# Altium PCB PSOC_LAY.PcbDoc (part 3 of 3)
Units mm, origin at the board's own origin, x right, y up, seen from the top; angles counter-clockwise.
Board outline 239.8 x 205.26 mm, 2 copper layers (Top Layer, Bottom Layer); 186 components, 165 nets, 780 pads, 226 vias.
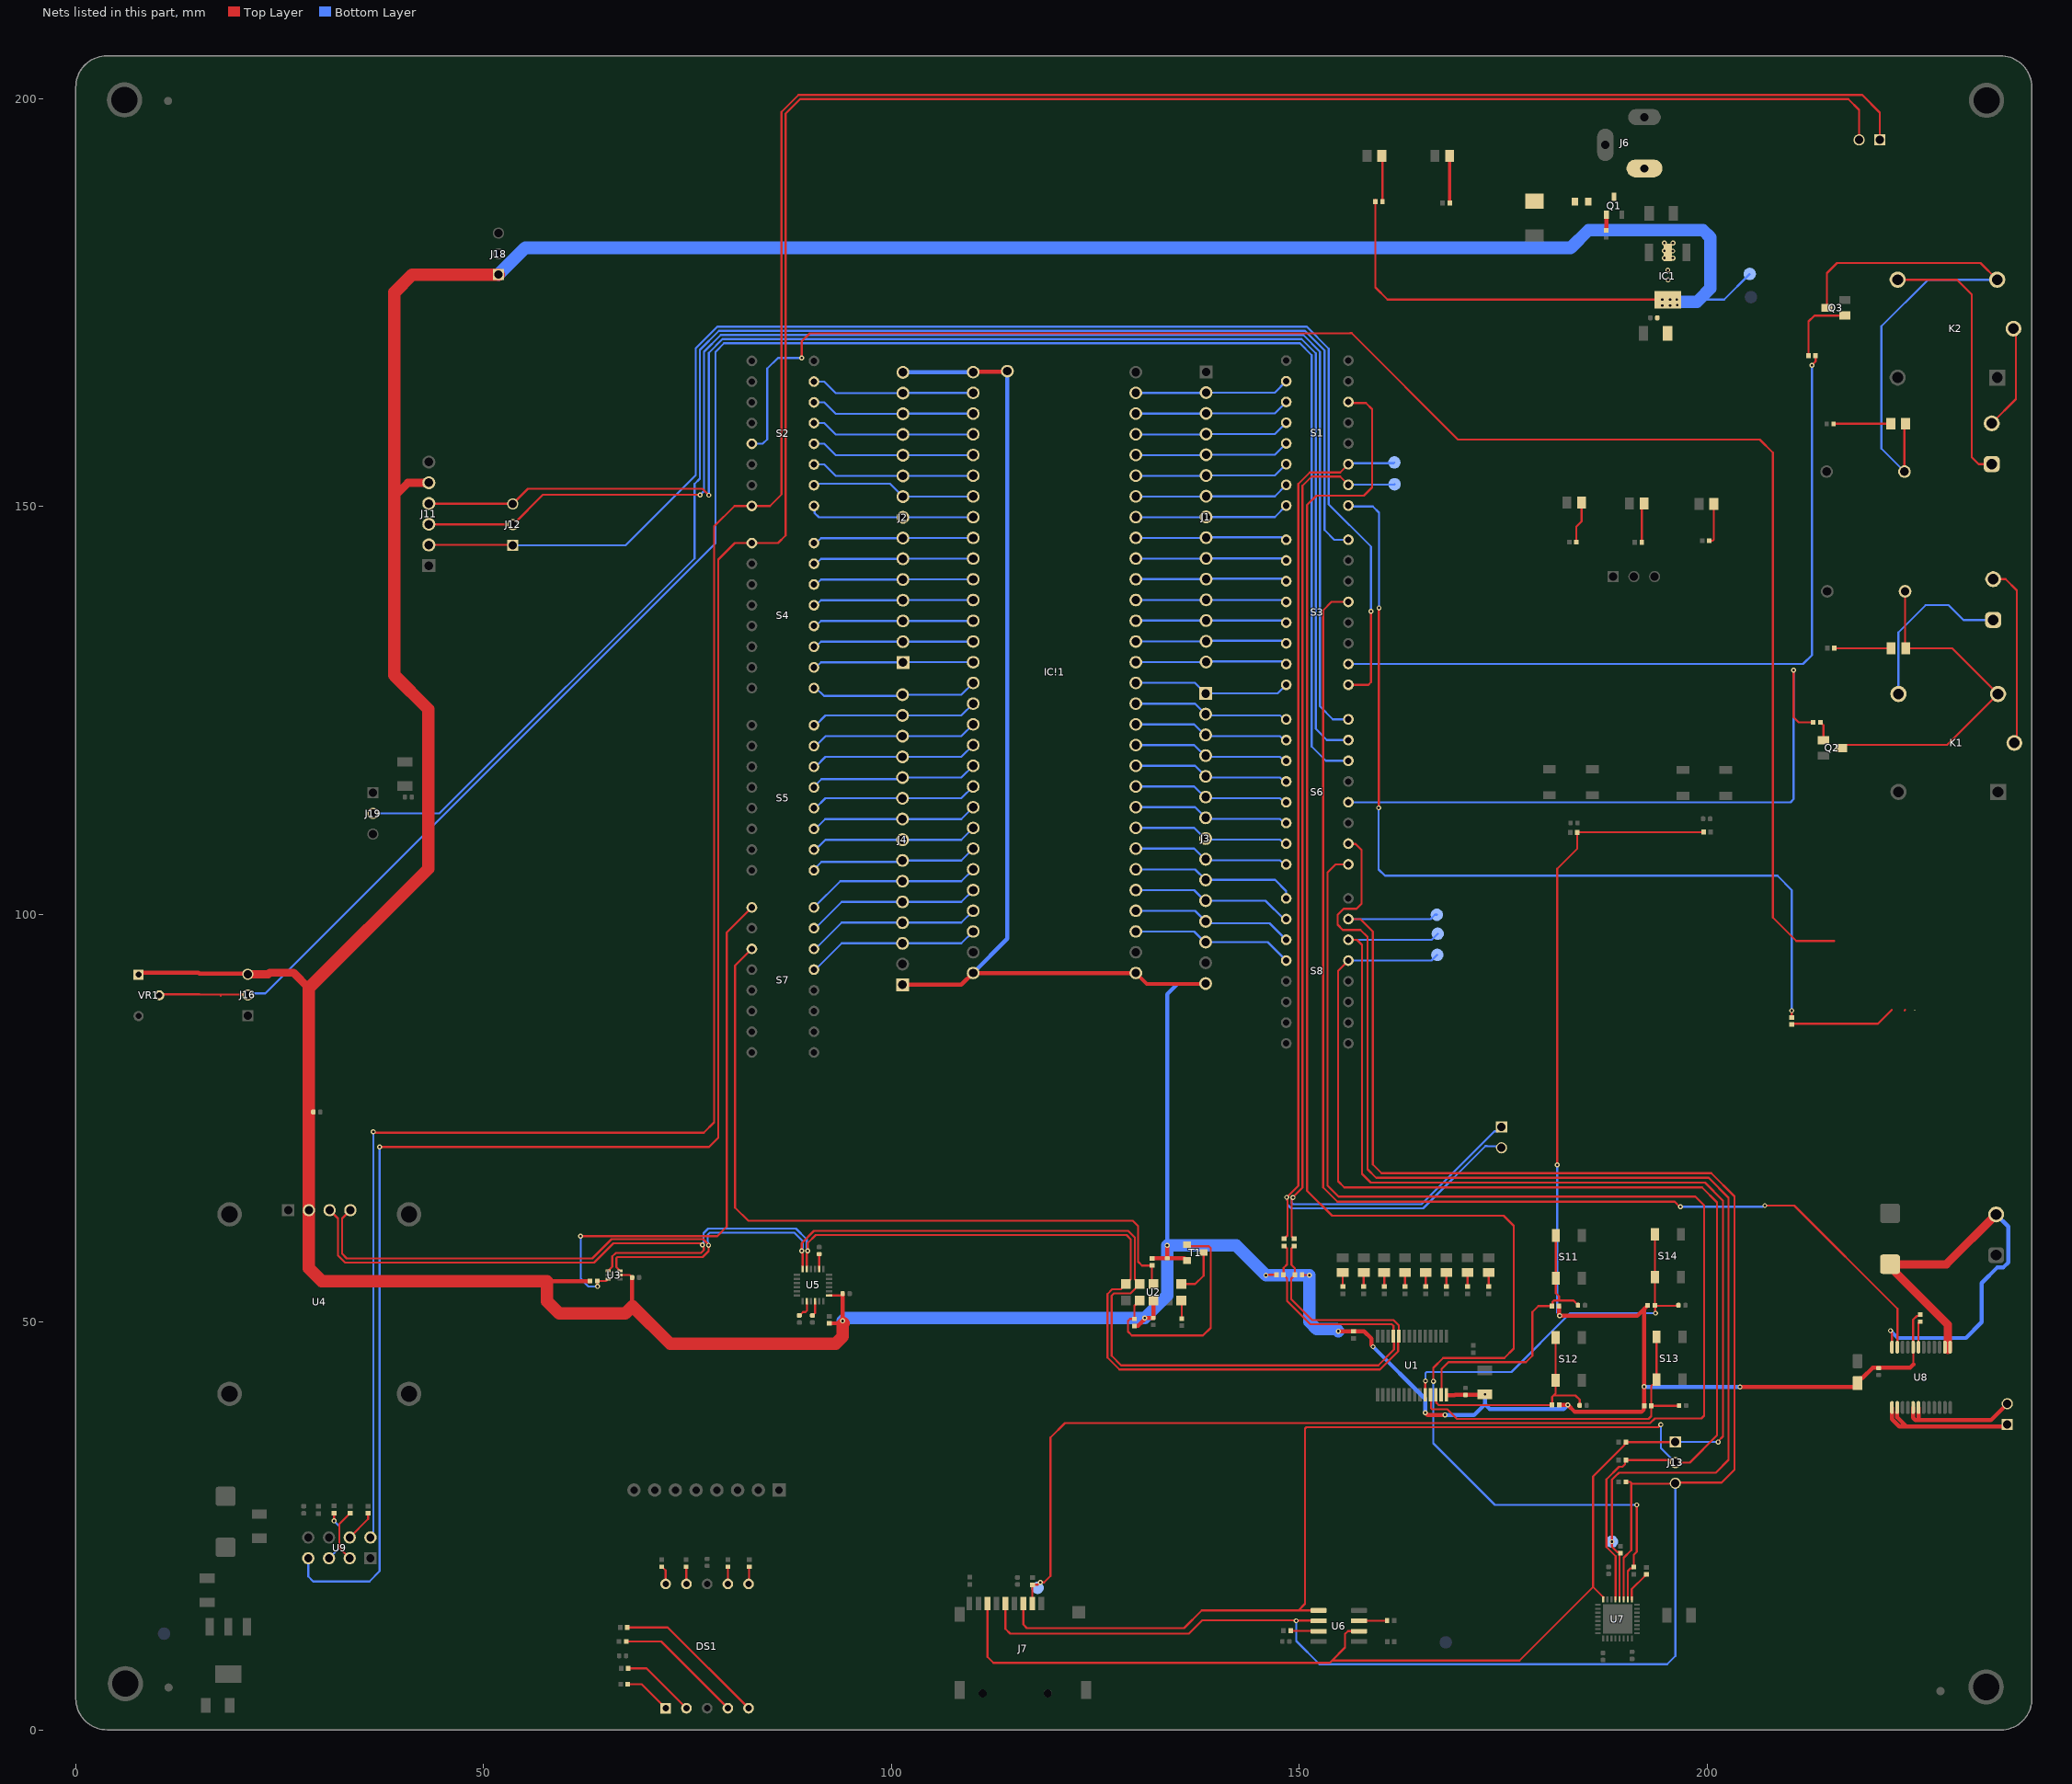
[diagram p2: the nets of this part, all layers, seen from the top]

## Via types
v1: diameter 0.61, hole 0.305, Top Layer to Bottom Layer, tented both sides, 162 vias
v2: diameter 0.61, hole 0.305, Top Layer to Bottom Layer, 64 vias

## Nets (pads, with @x,y where several pads share a name; then routed paths per layer and width w, separated by ;. In a path a pad name is that pad's centre, name@x,y a point inside that pad or via, vN(x,y) a via of type N, cw(c..) or ccw(c..) an arc to the next point about the centre after c; other vN are vias at no path point) (continued)
MISO: *5.TP J7.7 J13.1 R26.1 S8.6 U6.2 U7.24 | length 240
  Top Layer w0.254: J7.7@111.751,15.47 111.751,8.949 112.497,8.204 153.721,8.204 154,8.484 ; S8.6@156.007,96.85 157.048,96.85 157.669,96.23 157.669,68.148 158.736,67.081 199.72,67.081 201.93,64.872 201.93,35.961 201.346,35.377 v1(201.346,35.281) ; U6.2@157.313,12.09 155.947,12.09 155.6,11.743 155.6,10.084 154,8.484 ; U7.24@187.243,16.154 187.243,16.254 186.004,17.493 ; J13.1@196.088,35.306 196.037,35.255 190.041,35.255 189.868,35.082 189.868,34.931 186.004,31.067 186.004,17.493 ; 154,8.484 176.994,8.484 186.004,17.493
  Bottom Layer w0.254: S8.6@156.007,96.85 166.218,96.85 *5.TP@166.954,97.587 ; J13.1@196.088,35.306 196.113,35.281 v1(201.346,35.281)
MOSI: *7.TP J7.3 J13.2 R27.1 S8.5 U6.5 U7.21 | length 257.6
  Top Layer w0.254: J7.3@116.151,15.47 116.151,12.901 116.581,12.471 135.865,12.471 138.024,14.63 149.885,14.63 ; 150.17,14.63 149.885,14.63 ; 150.292,14.63 U6.5@152.363,14.63 ; S8.5@156.007,94.31 154.737,93.04 154.737,67.261 155.514,66.484 199.367,66.484 201.193,64.657 201.193,36.098 197.861,32.766 J13.2@196.088,32.766 ; U7.21@188.751,15.989 188.751,21.276 187.63,22.398 187.63,30.695 189.193,32.258 189.611,32.258 189.912,32.559 189.912,32.987 189.988,33.062 R27.1@190.021,33.062 195.49,33.062 J13.2@195.786,32.766 ; v1(194.31,37.414) 193.98,37.084 150.847,37.084 150.698,36.935 150.698,15.443 149.885,14.63
  Bottom Layer w0.254: S8.5@156.007,94.31 166.183,94.31 166.869,94.996 *7.TP@166.903,94.996 ; v1(194.31,37.414) 194.31,34.544 J13.2@196.088,32.766
NetC16_1: C16.1 U5.10 | length 1.9
  Top Layer w0.254: C16.1@90.297,50.798 90.318,50.798 90.627,51.107 U5.10@90.627,52.553
NetC19_1: C19.1 U5.8 | length 2.3
  Top Layer w0.254: C19.1@88.702,50.798 88.741,50.798 89.156,51.214 89.448,51.214 89.627,51.394 U5.8@89.627,52.553
NetC20_1: C20.1 U5.20 | length 1.8
  Top Layer w0.254: U5.20@91.127,56.493 91.127,58.312 C20.1@91.135,58.32
NetCR1_1: CR1.1 F1.2 J6.1 | length 0.6
  Top Layer w1.016: CR1.1@178.715,187.522 CR1.1@178.816,187.421 178.968,187.421 CR1.1@179.205,187.658
NetCS1_1: CS1.1 R53.1 | length 13.1
  Top Layer w0.254: R53.1@210.363,86.458 210.464,86.56 220.926,86.56 222.606,88.24 ; 224.206,88.189 224.257,88.24
NetD1_A: D1.A R58.2 | length 1.7
  Top Layer w0.254: R58.2@170.612,54.334 D1.A@170.612,56.072
NetD2_A: D2.A R61.2 | length 1.8
  Top Layer w0.254: R61.2@173.203,54.334 D2.A@173.203,56.072 D2.A@173.203,56.098
NetD3_A: D3.A R64.2 | length 1.8
  Top Layer w0.254: R64.2@157.886,54.224 R64.2@157.886,54.334 D3.A@157.886,56.072
NetD4_A: D4.A R62.2 | length 1.7
  Top Layer w0.254: R62.2@168.021,54.334 D4.A@168.021,56.072
NetD5_A: D5.A R59.2 | length 1.7
  Top Layer w0.254: R59.2@162.941,54.334 D5.A@162.941,56.072
NetD6_A: D6.A R60.2 | length 1.8
  Top Layer w0.254: R60.2@160.401,54.308 R60.2@160.401,54.334 D6.A@160.401,56.072
NetD7_A: D7.A R65.2 | length 1.7
  Top Layer w0.254: R65.2@155.321,54.334 D7.A@155.321,56.072
NetD8_A: D8.A R63.2 | length 1.7
  Top Layer w0.254: R63.2@165.481,54.334 D8.A@165.481,56.072
NetD9_2: D9.2 D14.C K1.A2 Q2.C | length 42.6
  Top Layer w0.254: Q2.C@216.441,120.371 216.814,120.744 229.402,120.744 K1.A2@235.644,126.986 230.042,132.588 D14.C@224.344,132.588 224.251,132.68 D9.2@224.251,139.573
NetD10_2: D10.2 D15.C K2.A2 Q3.C | length 68
  Top Layer w0.254: Q3.C@214.665,174.335 214.665,178.597 215.9,179.832 233.486,179.832 K2.A2@235.538,177.78 ; D10.2@224.175,154.254 224.175,159.989 D15.C@224.307,160.122
  Bottom Layer w0.254: D10.2@224.175,154.254 221.361,157.068 221.361,172.085 227.056,177.78 K2.A2@235.538,177.78
NetD11_A: D11.A R40.2 | length 5
  Top Layer w0.254: R40.2@200.257,145.771 200.647,145.771 200.796,145.919 D11.A@200.796,150.289
NetD12_A: D12.A R41.2 | length 4.9
  Top Layer w0.254: R41.2@191.976,145.593 191.976,150.055 D12.A@192.264,150.343
NetD13_A: D13.A R42.2 | length 5.1
  Top Layer w0.254: R42.2@183.95,145.618 183.95,147.497 184.593,148.14 D13.A@184.593,150.444
NetD14_A: D14.A R22.1 | length 7
  Top Layer w0.254: R22.1@215.568,132.613 215.593,132.588 D14.A@222.544,132.588
NetD15_A: D15.A R15.1 | length 7
  Top Layer w0.254: R15.1@215.492,160.096 215.517,160.122 D15.A@222.507,160.122
NetD18_A: D18.A R17.1 | length 5.5
  Top Layer w0.381: D18.A@168.413,192.71 168.422,192.701 168.422,187.181 R17.1@168.431,187.173
NetD20_A: D20.A R68.1 | length 5.1
  Top Layer w0.254: D20.A@160.166,192.481 160.184,192.464 R68.1@160.184,187.35
NetDS1_1: DS1.1 R48.1 | length 5.9
  Top Layer w0.254: R48.1@67.658,5.588 69.367,5.588 DS1.1@72.314,2.642
NetDS1_2: DS1.2 R47.1 | length 9.2
  Top Layer w0.254: R47.1@67.72,7.524 69.972,7.524 DS1.2@74.854,2.642
NetDS1_4: DS1.4 R46.1 | length 15.9
  Top Layer w0.254: R46.1@67.469,10.82 71.755,10.82 DS1.4@79.934,2.642
NetDS1_5: DS1.5 R52.1 | length 19
  Top Layer w0.254: R52.1@67.596,12.548 72.568,12.548 DS1.5@82.474,2.642
NetDS1_6: DS1.6 R45.1 | length 2.1
  Top Layer w0.254: DS1.6@82.474,17.882 82.525,17.932 82.525,19.936 R45.1@82.575,19.987
NetDS1_7: DS1.7 R43.1 | length 2.1
  Top Layer w0.254: DS1.7@79.934,17.882 R43.1@79.934,19.987
NetDS1_9: DS1.9 R49.1 | length 2.1
  Top Layer w0.254: R49.1@74.803,19.987 74.828,19.961 74.828,17.907 DS1.9@74.854,17.882
NetDS1_10: DS1.10 R50.1 | length 2.3
  Top Layer w0.254: R50.1@71.831,19.987 71.851,19.987 72.314,19.524 DS1.10@72.314,17.882
NetF1_1: F1.1 Q1.3
NetJ8_1: J8.1 U8.1 U8.2 | length 18.3
  Top Layer w0.508: U8.1@222.637,39.505 222.637,38.094 223.545,37.186 224.409,37.186 ; U8.2@223.287,38.959 223.287,38.307 224.409,37.186 ; J8.1@236.779,37.44 236.525,37.186 224.409,37.186
NetJ8_2: J8.2 U8.5 U8.6 | length 15.3
  Top Layer w0.508: U8.5@225.237,39.505 225.237,38.245 225.535,37.948 225.84,37.948 ; U8.6@225.887,39.505 225.887,37.995 225.84,37.948 ; J8.2@236.779,39.98 234.747,37.948 225.84,37.948
NetJ9_1: J9.1 K1.NO | length 21.3
  Bottom Layer w0.254: K1.NO@223.444,126.986 223.444,134.544 226.773,137.873 229.599,137.873 231.404,136.068 J9.1@235.052,136.068
NetJ9_2: J9.2 K1.COM | length 22.3
  Top Layer w0.254: J9.2@235.052,141.068 236.579,141.068 237.947,139.7 237.947,121.289 K1.COM@237.644,120.986
NetJ10_1: J10.1 K2.NO | length 32.6
  Top Layer w0.254: K2.NO@223.338,177.78 230.626,177.78 232.435,175.971 232.435,156.007 233.274,155.169 J10.1@234.874,155.169
NetJ10_2: J10.2 K2.COM | length 13
  Top Layer w0.254: J10.2@234.874,160.169 237.846,163.14 237.846,171.473 K2.COM@237.538,171.78
NetQ1_1: Q1.1 R3.1 | length 1.9
  Top Layer w0.5: R3.1@187.604,183.823 187.62,183.838 Q1.1@187.62,185.742
NetQ2_B: Q2.B R54.1 | length 2.4
  Top Layer w0.254: R54.1@213.871,123.52 213.871,123.5 214.024,123.347 214.044,123.347 214.241,123.15 Q2.B@214.241,121.321
NetQ3_B: Q3.B R55.1 | length 9
  Top Layer w0.254: R55.1@212.414,168.453 212.414,172.663 213.136,173.385 Q3.B@216.865,173.385
NetR1_1: R1.1 U8.19 | length 3.2
  Top Layer w0.254: U8.19@225.887,46.905 225.887,49.828 226.091,50.032 R1.1@226.111,50.032
NetR8_1: R8.1 T1.1 U2.2 | length 28.3
  Top Layer w0.254: U2.2@130.431,52.645 129.769,51.983 R8.1@129.769,50.371 129.224,50.371 128.981,50.129 128.981,48.808 129.453,48.336 138.176,48.336 139.119,49.279 139.119,59.055 138.896,59.278 136.403,59.278 T1.1@136.22,59.461
NetR9_1: R9.1 U2.5 | length 2.2
  Top Layer w0.254: U2.5@135.531,52.645 135.585,52.59 R9.1@135.585,50.422
NetR19_1: R19.1 U6.3 | length 3.4
  Top Layer w0.254: U6.3@157.313,13.36 160.725,13.36 R19.1@160.75,13.386
NetR21_2: R21.2 U7.17 | length 3.8
  Top Layer w0.254: U7.17@190.751,15.989 190.751,17.241 192.384,18.874 192.384,18.894 192.527,19.037 R21.2@192.547,19.037
NetR23_2: R23.2 U6.7 | length 3.5
  Top Layer w0.254: R23.2@148.923,12.141 148.949,12.116 152.338,12.116 U6.7@152.363,12.09
NetR37_2: R37.2 U9.7 | length 3.9
  Top Layer w0.254: U9.7@33.579,23.575 35.839,25.836 R37.2@35.839,26.54
NetR38_1: R38.1 U9.3 | length 6.3
  Top Layer w0.254: v1(31.648,25.603) 31.661,25.616 31.661,26.552 R38.1@31.674,26.565
  Bottom Layer w0.254: U9.3@31.039,21.035 32.309,22.305 32.309,24.943 v1(31.648,25.603)
NetR39_1: R39.1 U9.2 | length 6.6
  Top Layer w0.254: U9.2@33.579,21.035 32.309,22.305 32.309,25.239 33.61,26.54 R39.1@33.63,26.54
NetT1_3: T1.3 U2.6 | length 6
  Top Layer w0.254: U2.6@135.531,54.645 137.22,54.645 138.252,55.677 T1.3@138.252,58.496
P0_0: IC!1.46 J4.15 S4.1 | length 20.6
  Bottom Layer w0.254: S4.1@90.493,127.709 90.748,127.709 91.711,126.746 101.194,126.746 J4.15@101.346,126.898 108.56,126.898 IC!1.46@110.007,128.346
P0_1: IC!1.47 J4.14 S5.8 | length 20.6
  Bottom Layer w0.254: S5.8@90.493,123.154 90.696,123.154 91.9,124.358 J4.14@101.346,124.358 108.56,124.358 IC!1.47@110.007,125.806
P0_2: IC!1.48 J4.13 S5.7 | length 20.6
  Bottom Layer w0.254: S5.7@90.493,120.614 90.721,120.614 91.39,121.282 91.395,121.282 91.931,121.818 92.942,121.818 J4.13@101.346,121.818 108.56,121.818 IC!1.48@110.007,123.266
P0_3: IC!1.49 J4.12 S5.6 | length 20.6
  Bottom Layer w0.254: S5.6@90.493,118.074 90.696,118.074 91.9,119.278 J4.12@101.346,119.278 108.56,119.278 IC!1.49@110.007,120.726
P0_4: IC!1.50 J4.11 S5.5 | length 20.7
  Bottom Layer w0.254: S5.5@90.493,115.534 90.493,115.654 91.4,116.561 101.168,116.561 J4.11@101.346,116.738 108.56,116.738 IC!1.50@110.007,118.186
P0_5: IC!1.51 J4.10 S5.4 | length 20.6
  Bottom Layer w0.254: S5.4@90.493,112.994 90.686,112.994 91.891,114.198 92.942,114.198 J4.10@101.346,114.198 108.56,114.198 IC!1.51@110.007,115.646
P0_6: IC!1.52 J4.9 S5.3 | length 20.6
  Bottom Layer w0.254: S5.3@90.493,110.454 90.669,110.454 91.874,111.658 J4.9@101.346,111.658 108.56,111.658 IC!1.52@110.007,113.106
P0_7: IC!1.53 J4.8 S5.2 | length 20.6
  Bottom Layer w0.254: S5.2@90.493,107.914 90.696,107.914 91.9,109.118 J4.8@101.346,109.118 108.56,109.118 IC!1.53@110.007,110.566
P1_0: IC!1.28 J3.13 S8.A5 | length 19.9
  Bottom Layer w0.254: IC!1.28@129.946,97.866 137.109,97.866 138.405,96.571 J3.13@138.506,96.571 146.126,96.571 S8.A5@148.387,94.31
P1_1: IC!1.27 J3.12 S8.A6 | length 19.9
  Bottom Layer w0.254: IC!1.27@129.946,100.406 137.211,100.406 J3.12@138.506,99.111 138.735,98.882 146.355,98.882 S8.A6@148.387,96.85
P1_2: IC!1.26 J3.11 S8.A7 | length 19.9
  Bottom Layer w0.254: IC!1.26@129.946,102.946 137.109,102.946 138.405,101.651 J3.11@138.506,101.651 145.847,101.651 148.107,99.39 S8.A7@148.387,99.39
P1_3: IC!1.25 J3.10 S8.A8 | length 20.4
  Bottom Layer w0.254: IC!1.25@129.946,105.486 137.211,105.486 J3.10@138.506,104.191 147.015,104.191 148.387,102.819 S8.A8@148.387,101.93
P1_4: IC!1.24 J3.9 S6.A1 | length 19.2
  Bottom Layer w0.254: IC!1.24@129.946,108.026 137.109,108.026 138.405,106.731 J3.9@138.506,106.731 138.646,106.591 147.606,106.591 148.102,106.096 S6.A1@148.387,106.096
P1_5: IC!1.23 J3.8 S6.A2 | length 19.2
  Bottom Layer w0.254: IC!1.23@129.946,110.566 137.109,110.566 138.405,109.271 J3.8@138.506,109.271 138.646,109.131 147.606,109.131 148.102,108.636 S6.A2@148.387,108.636
P1_6: IC!1.22 J3.7 S6.A3 | length 19.2
  Bottom Layer w0.254: IC!1.22@129.946,113.106 137.211,113.106 J3.7@138.506,111.811 138.646,111.671 147.606,111.671 148.102,111.176 S6.A3@148.387,111.176
P1_7: IC!1.21 J3.6 S6.A4 | length 19.2
  Bottom Layer w0.254: IC!1.21@129.946,115.646 137.109,115.646 138.405,114.351 J3.6@138.506,114.351 138.646,114.211 147.606,114.211 148.102,113.716 S6.A4@148.387,113.716
P2_0: IC!1.20 J3.5 S6.A5 | length 19.2
  Bottom Layer w0.254: IC!1.20@129.946,118.186 137.211,118.186 J3.5@138.506,116.891 138.646,116.751 147.606,116.751 148.102,116.256 S6.A5@148.387,116.256
P2_1: IC!1.19 J3.4 S6.A6 | length 19.2
  Bottom Layer w0.254: IC!1.19@129.946,120.726 137.109,120.726 138.405,119.431 J3.4@138.506,119.431 138.646,119.291 147.606,119.291 148.102,118.796 S6.A6@148.387,118.796
P2_2: IC!1.18 J3.3 S6.A7 | length 19.2
  Bottom Layer w0.254: IC!1.18@129.946,123.266 137.109,123.266 138.405,121.971 J3.3@138.506,121.971 138.646,121.831 147.606,121.831 148.102,121.336 S6.A7@148.387,121.336
P2_3: IC!1.17 J3.2 S6.A8 | length 19.2
  Bottom Layer w0.254: IC!1.17@129.946,125.806 137.211,125.806 J3.2@138.506,124.511 138.646,124.371 147.606,124.371 148.102,123.876 S6.A8@148.387,123.876
P2_4: IC!1.16 J3.1 S3.A1 | length 19.4
  Bottom Layer w0.254: IC!1.16@129.946,128.346 137.211,128.346 J3.1@138.506,127.051 147.32,127.051 S3.A1@148.387,128.118
P2_5: IC!1.15 J1.15 S3.A2 | length 18.6
  Bottom Layer w0.254: IC!1.15@129.946,130.886 138.532,130.886 J1.15@138.557,130.912 ; J1.15@138.557,130.975 147.225,130.975 147.227,130.972 147.787,130.972 148.102,130.658 S3.A2@148.387,130.658
P2_6: IC!1.14 J1.14 S3.A3 | length 18.6
  Bottom Layer w0.254: IC!1.14@129.946,133.426 138.532,133.426 J1.14@138.557,133.452 ; J1.14@138.557,133.515 147.784,133.515 148.102,133.198 S3.A3@148.387,133.198
P2_7: IC!1.13 J1.13 S3.A4 | length 18.6
  Bottom Layer w0.254: IC!1.13@129.946,135.966 129.972,135.992 147.848,135.992 148.102,135.738 S3.A4@148.387,135.738
P3_0: IC!1.7 J1.7 S1.A2 | length 19
  Bottom Layer w0.254: IC!1.7@129.946,151.206 129.959,151.194 138.519,151.194 J1.7@138.557,151.232 146.99,151.232 S1.A2@148.387,152.629
P3_1: IC!1.6 J1.6 S1.A3 | length 19
  Bottom Layer w0.254: IC!1.6@129.946,153.746 129.959,153.733 138.519,153.733 J1.6@138.557,153.772 146.99,153.772 S1.A3@148.387,155.169
P3_2: IC!1.5 J1.5 S1.A4 | length 19
  Bottom Layer w0.254: IC!1.5@129.946,156.286 129.959,156.273 138.519,156.273 J1.5@138.557,156.312 146.99,156.312 S1.A4@148.387,157.709
P3_3: IC!1.4 J1.4 S1.A5 | length 19
  Bottom Layer w0.254: IC!1.4@129.946,158.826 129.959,158.814 138.519,158.814 J1.4@138.557,158.852 146.99,158.852 S1.A5@148.387,160.249
P3_4: IC!1.3 J1.3 S1.A6 | length 19
  Bottom Layer w0.254: IC!1.3@129.946,161.366 129.959,161.353 138.519,161.353 J1.3@138.557,161.392 146.99,161.392 S1.A6@148.387,162.789
P3_5: IC!1.2 J1.2 S1.A7 | length 19
  Bottom Layer w0.254: IC!1.2@129.946,163.906 129.959,163.893 138.519,163.893 J1.2@138.557,163.932 146.99,163.932 S1.A7@148.387,165.329
P3_6: IC!1.32 J2.14 S2.7 | length 20.1
  Bottom Layer w0.254: S2.7@90.493,165.284 91.763,165.284 93.166,163.881 J2.14@101.397,163.881 101.409,163.893 109.995,163.893 IC!1.32@110.007,163.906
P3_7: IC!1.33 J2.13 S2.6 | length 20.1
  Bottom Layer w0.254: S2.6@90.493,162.744 91.763,162.744 93.166,161.341 J2.13@101.397,161.341 101.409,161.353 109.995,161.353 IC!1.33@110.007,161.366
P4_0: IC!1.34 J2.12 S2.5 | length 20.1
  Bottom Layer w0.254: S2.5@90.493,160.204 91.763,160.204 93.166,158.801 J2.12@101.397,158.801 101.409,158.814 109.995,158.814 IC!1.34@110.007,158.826
P4_1: IC!1.35 J2.11 S2.4 | length 20.1
  Bottom Layer w0.254: S2.4@90.493,157.664 91.763,157.664 93.166,156.261 J2.11@101.397,156.261 101.409,156.273 109.995,156.273 IC!1.35@110.007,156.286
P4_2: IC!1.36 J2.10 S2.3 | length 20.1
  Bottom Layer w0.254: S2.3@90.493,155.124 91.763,155.124 93.166,153.721 J2.10@101.397,153.721 101.409,153.733 109.995,153.733 IC!1.36@110.007,153.746
P4_3: IC!1.37 J2.9 S2.2 | length 20.2
  Bottom Layer w0.254: S2.2@90.493,152.584 90.664,152.756 99.822,152.756 J2.9@101.397,151.181 101.409,151.194 109.995,151.194 IC!1.37@110.007,151.206
P4_4: IC!1.38 J2.8 S2.1 | length 20.6
  Bottom Layer w0.254: S2.1@90.493,150.044 90.577,149.96 90.577,149.173 91.11,148.641 J2.8@101.397,148.641 101.409,148.653 109.995,148.653 IC!1.38@110.007,148.666
P4_5: IC!1.39 J2.7 S4.8 | length 19.8
  Bottom Layer w0.254: S4.8@90.493,145.489 90.733,145.489 91.345,146.101 J2.7@101.397,146.101 101.409,146.113 109.995,146.113 IC!1.39@110.007,146.126
P4_6: IC!1.40 J2.6 S4.7 | length 19.8
  Bottom Layer w0.254: S4.7@90.493,142.949 90.733,142.949 91.345,143.561 J2.6@101.397,143.561 101.409,143.573 109.995,143.573 IC!1.40@110.007,143.586
P4_7: IC!1.41 J2.5 S4.6 | length 19.8
  Bottom Layer w0.254: S4.6@90.493,140.409 90.733,140.409 91.345,141.021 J2.5@101.397,141.021 101.409,141.034 109.995,141.034 IC!1.41@110.007,141.046
P5_0: IC!1.54 J4.7 S5.1 | length 20.7
  Bottom Layer w0.254: S5.1@90.493,105.374 90.493,105.494 91.4,106.401 101.168,106.401 J4.7@101.346,106.578 108.56,106.578 IC!1.54@110.007,108.026
P5_1: IC!1.55 J4.6 S7.8 | length 21.4
  Bottom Layer w0.254: S7.8@90.493,100.819 93.712,104.038 J4.6@101.346,104.038 108.56,104.038 IC!1.55@110.007,105.486
P5_2: IC!1.56 J4.5 S7.7 | length 21.4
  Bottom Layer w0.254: S7.7@90.493,98.279 90.669,98.279 93.889,101.498 J4.5@101.346,101.498 108.56,101.498 IC!1.56@110.007,102.946
P5_3: IC!1.57 J4.4 S7.6 | length 21.4
  Bottom Layer w0.254: S7.6@90.493,95.739 90.687,95.739 93.906,98.958 J4.4@101.346,98.958 108.56,98.958 IC!1.57@110.007,100.406
P5_5: IC!1.58 J4.3 S7.5 | length 21.4
  Bottom Layer w0.254: S7.5@90.493,93.199 90.687,93.199 93.906,96.418 J4.3@101.346,96.418 108.56,96.418 IC!1.58@110.007,97.866
P5_6: IC!1.42 J2.4 S4.5 | length 19.8
  Bottom Layer w0.254: S4.5@90.493,137.869 90.733,137.869 91.345,138.481 J2.4@101.397,138.481 101.409,138.493 109.995,138.493 IC!1.42@110.007,138.506
P5_7: IC!1.43 J2.3 S4.4 | length 19.8
  Bottom Layer w0.254: S4.4@90.493,135.329 90.733,135.329 91.345,135.941 J2.3@101.397,135.941 101.409,135.953 109.995,135.953 IC!1.43@110.007,135.966
P6_0: IC!1.12 J1.12 S3.A5 | length 18.5
  Bottom Layer w0.254: IC!1.12@129.946,138.506 147.873,138.506 148.102,138.278 S3.A5@148.387,138.278
P6_1: IC!1.11 J1.11 S3.A6 | length 18.6
  Bottom Layer w0.254: IC!1.11@129.946,141.046 129.972,141.072 J1.11@138.557,141.072 ; J1.11@138.557,141.135 147.784,141.135 148.102,140.818 S3.A6@148.387,140.818
P6_2: IC!1.10 J1.10 S3.A7 | length 18.6
  Bottom Layer w0.254: IC!1.10@129.946,143.586 138.532,143.586 J1.10@138.557,143.612 147.848,143.612 148.102,143.358 S3.A7@148.387,143.358
P6_4: IC!1.9 J1.9 S3.A8 | length 18.5
  Bottom Layer w0.254: IC!1.9@129.946,146.126 129.959,146.113 138.519,146.113 J1.9@138.557,146.152 ; J1.9@138.608,146.202 147.797,146.202 148.102,145.898 S3.A8@148.387,145.898
P6_5: IC!1.8 J1.8 S1.A1 | length 19
  Bottom Layer w0.254: IC!1.8@129.946,148.666 138.532,148.666 J1.8@138.557,148.692 146.99,148.692 S1.A1@148.387,150.089
P7_0: IC!1.44 J2.2 S4.3 | length 19.8
  Bottom Layer w0.254: S4.3@90.493,132.789 90.733,132.789 91.345,133.401 J2.2@101.397,133.401 101.409,133.413 109.995,133.413 IC!1.44@110.007,133.426
P7_1: IC!1.45 J2.1 S4.2 | length 19.8
  Bottom Layer w0.254: S4.2@90.493,130.249 90.733,130.249 91.345,130.861 J2.1@101.397,130.861 101.422,130.886 IC!1.45@110.007,130.886
PIR: R20.2 S1.6 U7.18 | length 208.3
  Top Layer w0.254: S1.6@156.032,162.789 156.152,162.669 158.151,162.669 158.928,161.892 158.928,152.324 157.912,151.308 152.095,151.308 150.952,150.165 150.952,66.073 154.008,63.017 175.031,63.017 176.276,61.773 176.276,46.729 175.136,45.589 167.636,45.589 166.421,44.374 v1(166.421,42.723) ; U7.18@190.251,15.989 190.251,19.46 190.581,19.789 190.83,19.789 R20.2@190.983,19.942 190.983,21.445 191.364,21.826 v1(191.364,27.571)
  Bottom Layer w0.254: v1(166.421,42.723) 166.421,35.128 173.978,27.571 v1(191.364,27.571)
POT: J16.2 S6.6 VR1.2 | length 242.2
  Top Layer w0.254: VR1.2@10.236,90.043 10.351,90.157 15.165,90.157 ; 15.178,90.145 21.031,90.145 J16.2@21.082,90.094 ; 17.756,90.005 17.769,89.992 ; S6.6@156.007,118.796 S6.6@156.224,118.796
  Bottom Layer w0.254: J16.2@21.082,90.094 21.26,90.272 23.223,90.272 78.41,145.459 78.41,168.91 79.477,169.977 150.06,169.977 151.507,168.529 151.507,120.552 153.25,118.81 155.993,118.81 S6.6@156.007,118.796
PRO_INT: R6.1 S7.A6 U2.8 | length 91.5
  Top Layer w0.254: S7.A6@82.873,95.739 80.823,93.689 80.823,64.026 82.441,62.408 129.565,62.408 130.216,61.757 130.216,57.4 130.697,56.918 R6.1@131.928,56.918 131.928,54.848 U2.8@132.131,54.645
PWMA: S3.5 U8.23 | length 155.7
  Top Layer w0.254: S3.5@156.007,138.278 153.939,138.278 152.908,137.247 152.908,66.497 154.661,64.745 196.002,64.745 196.612,64.135 v1(196.708,64.135) ; v1(207.061,64.262) 210.668,64.262 223.331,51.598 223.331,47.663 223.325,47.657 223.325,46.943 U8.23@223.287,46.905
  Bottom Layer w0.254: v1(196.708,64.135) 206.837,64.135 206.965,64.262 v1(207.061,64.262)
RELAY_1: R55.2 S3.2 | length 94.2
  Top Layer w0.254: v1(212.835,167.271) 212.835,167.311 213.296,167.772 213.296,168.44 R55.2@213.284,168.453
  Bottom Layer w0.254: S3.2@156.007,130.658 211.744,130.658 212.835,131.749 v1(212.835,167.271)
RELAY_2: R54.2 S6.4 | length 79
  Top Layer w0.254: v1(210.591,129.896) 210.591,124.13 211.201,123.52 R54.2@213.001,123.52
  Bottom Layer w0.254: S6.4@156.007,113.716 210.21,113.716 210.591,114.097 v1(210.591,129.896)
RX: J14.1 S2.A1 U9.8 | length 361.8
  Top Layer w0.254: v1(36.474,73.304) 36.542,73.236 36.767,73.236 36.801,73.203 76.997,73.203 78.257,74.463 78.257,147.549 80.753,150.044 S2.A1@82.873,150.044 85.096,150.044 86.51,151.458 86.51,198.354 88.588,200.431 218.999,200.431 221.158,198.272 J14.1@221.158,194.92
  Bottom Layer w0.254: U9.8@36.119,23.575 36.119,23.914 36.474,24.27 v1(36.474,73.304)
S_N: *2.TP J5.2 R12.1 R14.1 R14.2 S1.3 U1.11 U2.9 U3.6 U4.4 U5.24 | length 340.4
  Top Layer w0.254: U4.4@33.655,63.697 32.639,62.681 32.639,58.369 33.223,57.785 63.322,57.785 65.684,60.147 76.889,60.147 77.573,59.463 v1(77.573,59.411) 77.573,58.69 76.846,57.963 66.417,57.963 66.269,57.814 66.269,56.709 U3.6@66.724,56.253 ; U5.24@89.098,56.82 89.098,58.377 89.052,58.423 89.052,58.657 v1(88.984,58.725) 88.984,59.654 90.493,61.163 129.014,61.163 129.835,60.342 129.835,55.241 U2.9@130.431,54.645 129.285,53.499 127.26,53.499 126.975,53.213 126.975,45.847 128.143,44.679 159.664,44.679 161.597,46.611 161.597,48.189 U1.11@161.526,48.26 161.526,49.524 161.32,49.729 151.34,49.729 148.488,52.581 148.488,55.33 148.06,55.758 R12.1@148.06,55.778 148.06,56.623 148.488,57.052 148.488,59.029 148.34,59.178 148.286,59.178 R14.1@148.133,59.331 ; R14.2@148.133,60.201 148.153,60.201 148.543,60.592 148.543,64.939 148.506,64.977 148.506,65.21 v1(148.438,65.278) ; v1@148.488,65.278 148.488,65.311 149.86,66.682 149.86,152.728 151.285,154.153 154.991,154.153 S1.3@156.007,155.169
  Bottom Layer w0.254: v1(77.573,59.411) 77.505,59.479 77.505,59.71 77.464,59.752 77.464,60.678 77.72,60.935 88.087,60.935 89.098,59.924 89.098,59.072 89.052,59.026 89.052,58.793 v1(88.984,58.725) ; v1(148.438,65.278) 148.506,65.21 148.506,64.977 148.552,64.93 148.552,64.382 148.998,63.935 165.187,63.935 172.809,71.557 173.019,71.557 173.025,71.552 174.574,71.552 J5.2@174.777,71.349 ; S1.3@156.007,155.169 156.108,155.27 161.544,155.27 *2.TP@161.646,155.372
S_P: *1.TP J5.1 R5.1 R5.2 R11.1 S1.2 U1.10 U2.10 U3.1 U4.3 U5.23 | length 339.7
  Top Layer w0.254: U4.3@31.115,63.697 32.131,62.681 32.131,58.159 33.013,57.277 63.533,57.277 65.895,59.639 76.51,59.639 76.739,59.411 v1@76.808,59.411 ; U3.1@65.254,56.253 65.761,56.759 65.761,58.024 66.207,58.471 76.635,58.471 76.974,58.81 76.974,59.175 76.808,59.341 v1@76.808,59.411 ; v1(76.808,59.437) v1@76.808,59.411 ; U5.23@89.606,56.82 89.606,58.377 89.652,58.423 89.652,58.657 v1(89.721,58.725) 89.721,59.672 90.703,60.655 128.803,60.655 129.327,60.132 129.327,55.241 U2.10@128.731,54.645 128.258,54.172 128.258,54.156 128.109,54.007 127.05,54.007 126.467,53.423 126.467,45.637 127.933,44.171 159.875,44.171 162.105,46.4 162.105,48.189 U1.10@162.176,48.26 162.176,49.592 161.531,50.237 151.551,50.237 148.996,52.791 148.996,55.304 149.442,55.75 R11.1@149.442,55.77 ; R5.1@149.352,59.331 149.332,59.331 149.022,59.021 149.022,56.998 149.45,56.569 R11.1@149.45,55.778 R11.1@149.45,55.758 ; R5.2@149.352,60.201 149.332,60.201 149.051,60.482 149.051,64.987 149.21,65.146 v1(149.21,65.242) 149.21,65.314 150.368,66.472 150.368,152.517 151.495,153.645 154.991,153.645 S1.2@156.007,152.629
  Bottom Layer w0.254: v1(76.808,59.437) 76.808,59.534 76.956,59.681 76.956,60.888 77.51,61.443 88.298,61.443 89.606,60.134 89.606,59.072 89.652,59.026 89.652,58.793 v1(89.721,58.725) ; v1(149.21,65.242) 149.142,65.174 149.142,65.013 149.06,64.93 149.06,64.592 149.209,64.443 164.977,64.443 173.899,73.366 174.255,73.366 J5.1@174.777,73.889 ; S1.2@156.007,152.629 156.045,152.667 161.633,152.667 *1.TP@161.671,152.705
SCK: *9.TP J7.5 J13.3 R25.1 S8.7 U6.6 U7.19 | length 265.6
  Top Layer w0.254: J7.5@113.951,15.47 113.951,12.388 114.554,11.786 136.459,11.786 138.085,13.411 v1@149.606,13.411 ; v1(149.606,13.36) 149.631,13.386 152.338,13.386 U6.6@152.363,13.36 ; S8.7@156.007,99.39 157.48,99.39 159.004,97.866 159.004,69.317 160.071,68.25 200.482,68.25 203.327,65.405 203.327,31.877 201.752,30.302 J13.3@196.088,30.302 ; U7.19@189.751,15.989 189.751,21.093 190.678,22.019 190.678,30.251 ; R25.1@190.021,30.378 190.551,30.378 190.678,30.251 ; J13.3@196.088,30.226 196.037,30.175 190.754,30.175 190.678,30.251
  Bottom Layer w0.254: v1(149.606,13.36) 149.606,10.892 152.472,8.026 195.072,8.026 196.088,9.042 J13.3@196.088,30.226 ; S8.7@156.007,99.39 166.069,99.39 166.602,99.924 *9.TP@166.853,99.924
SD_CARD_CS: *3.TP J7.2 R34.2 S6.1 | length 217.5
  Top Layer w0.254: J7.2@117.251,15.47 117.251,17.745 R34.2@117.283,17.777 117.924,17.777 118.206,18.059 v1(118.237,18.059) 118.248,18.071 118.688,18.071 119.482,18.865 119.482,35.814 121.26,37.592 192.996,37.592 193.581,38.176 199.288,38.176 199.619,38.506 199.619,64.287 198.552,65.354 154.813,65.354 153.441,66.726 153.441,105.105 154.432,106.096 S6.1@156.007,106.096
SECURE_CS: *4.TP R16.2 S6.2 U7.20 | length 154.4
  Top Layer w0.254: S6.2@156.007,108.636 156.055,108.588 156.893,108.588 157.607,107.874 157.607,101.27 156.997,100.66 155.423,100.66 154.686,99.924 154.686,98.698 155.315,98.069 157.48,98.069 158.344,97.206 158.344,68.732 159.41,67.666 200.177,67.666 202.616,65.227 202.616,33.096 201.041,31.521 189.175,31.521 188.713,31.059 188.316,30.662 v1(188.316,23.063) 188.316,22.43 188.955,21.791 189.204,21.791 R16.2@189.357,21.638 189.253,21.534 189.253,15.991 U7.20@189.251,15.989
SERVO_SIG: J19.2 S3.8 | length 182.2
  Bottom Layer w0.254: J19.2@36.424,112.344 44.577,112.344 75.844,143.612 75.844,152.735 76.505,153.395 76.505,169.16 78.845,171.501 150.691,171.501 153.086,169.106 153.086,147.091 154.28,145.898 S3.8@156.007,145.898
SHIELD: S2.A4 | length 208.8
  Top Layer w0.254: v1(89.002,168.199) 89.002,170.231 89.967,171.196 156.185,171.196 156.206,171.218 156.417,171.218 169.443,158.191 206.426,158.191 208.051,156.566 208.051,99.568 210.922,96.698 215.57,96.698
  Bottom Layer w0.254: S2.A4@82.873,157.664 84.207,157.664 84.76,158.217 84.76,166.878 86.081,168.199 v1(89.002,168.199)
SW_joy: J11.2 J12.1 S3.1 | length 177.8
  Top Layer w0.254: J11.2@43.282,145.263 53.518,145.263 J12.1@53.569,145.212 ; S3.1@156.007,128.118 158.456,128.118 158.775,128.437 v1(158.775,137.131)
  Bottom Layer w0.254: J12.1@53.569,145.212 67.412,145.212 75.997,153.797 75.997,169.371 78.635,172.009 150.901,172.009 153.594,169.316 153.594,150.241 158.775,145.059 v1(158.775,137.131) v1@158.627,136.982
switch1: C33.1 R56.1 S11.1 S11.2 U1.27 | length 35.2
  Top Layer w0.254: U1.27@167.376,41.059 167.429,41.112 167.429,44.239 168.271,45.081 177.785,45.081 178.562,45.858 178.562,51.206 179.299,51.943 R56.1@180.95,51.943 181.028,52.022 181.028,52.475 181.177,52.624 181.82,52.624 ; S11.2@181.432,60.597 S11.1@181.432,55.347 181.432,53.525 181.82,53.137 181.82,52.624 ; C33.1@184.152,52.045 184.152,52.075 183.602,52.624 181.82,52.624
switch2: C36.1 R57.1 S12.1 S12.2 U1.26 | length 27.8
  Top Layer w0.254: U1.26@166.726,41.059 166.779,41.006 166.779,40.095 167.002,39.872 167.011,39.872 167.076,39.807 180.949,39.807 R57.1@180.984,39.843 180.984,40.816 181.407,41.239 S12.1@181.407,42.841 S12.2@181.407,48.091 ; 181.193,40.996 183.845,40.996 184.355,40.486 C36.1@184.355,39.772
switch3: C34.1 R66.1 S13.1 S13.2 U1.25 | length 42.8
  Top Layer w0.254: U1.25@166.076,41.059 166.129,41.006 166.129,39.443 166.277,39.294 168.127,39.294 169.321,38.1 192.786,38.1 193.134,38.448 R66.1@193.134,39.7 ; S13.2@193.777,48.176 S13.1@193.777,42.926 193.777,42.651 193.404,42.278 193.282,42.278 193.134,42.129 R66.1@193.134,39.7 ; C34.1@196.547,39.751 196.522,39.726 193.159,39.726 R66.1@193.134,39.7
switch4: C35.1 R67.1 S14.1 S14.2 U1.24 | length 46.5
  Top Layer w0.254: U1.24@165.426,41.059 165.441,41.074 165.441,42.759 v1(165.456,42.774) ; S14.2@193.574,60.74 S14.1@193.574,55.49 R67.1@193.574,52.028 R67.1@193.612,51.99 ; v1(193.65,51.079) 193.612,51.117 R67.1@193.612,51.99 ; C35.1@196.467,52.045 196.404,51.981 193.621,51.981 R67.1@193.612,51.99
  Bottom Layer w0.254: v1(165.456,42.774) 165.456,43.722 165.604,43.87 175.986,43.87 183.195,51.079 v1(193.65,51.079)
TEMP_ALERT: R13.1 S7.A8 U3.3 | length 68.4
  Top Layer w0.254: v1(61.874,60.528) 78.638,60.528 79.807,61.697 79.807,97.753 S7.A8@82.873,100.819 ; v1(63.957,54.356) 63.933,54.38 63.933,54.993 R13.1@63.91,55.016 64.973,55.016 U3.3@65.075,55.118
  Bottom Layer w0.254: v1@61.9,60.528 61.9,55.296 62.84,54.356 v1(63.957,54.356)
TOUCH_1: R53.2 S1.1 | length 115.2
  Top Layer w0.254: v1(159.715,113.03) 159.741,113.055 159.741,137.516 v1(159.766,137.541) ; v1(210.363,88.163) 210.363,87.348 R53.2@210.383,87.328
  Bottom Layer w0.254: S1.1@156.007,150.089 156.113,149.982 158.989,149.982 159.766,149.205 v1(159.766,137.541) ; v1(159.715,113.03) 159.715,105.486 160.499,104.703 208.606,104.703 210.363,102.946 v1(210.363,88.163)
TX: J14.2 S4.A8 U9.4 | length 374.4
  Top Layer w0.254: v1(37.236,71.45) 77.632,71.45 78.765,72.584 78.765,143.459 80.795,145.489 S4.A8@82.873,145.489 86.079,145.489 87.018,146.429 87.018,198.143 88.798,199.923 217.297,199.923 218.618,198.603 J14.2@218.618,194.92
  Bottom Layer w0.254: U9.4@28.499,21.035 28.499,18.796 29.108,18.186 35.992,18.186 37.254,19.448 37.254,71.433 v1(37.236,71.45)
VCC: *10.TP C1.2 C5.1 C7.1 C9.2 C10.2 C11.1 C12.2 C13.2 C15.2 C21.1 C22.1 IC1.2 IC1.4 IC!1.30 IC!1.31 IC!1.60 IC!1.61 J2.15 J3.15 J4.1 J11.5 J16.3 J18.1 R1.2 R2.2 R6.2 R8.2 R10.1 R11.2 R12.2 R13.2 R44.2 R51.1 R56.2 R57.2 R66.2 R67.2 R68.2 T1.2 U1.28 U2.3 U3.5 U4.2 U5.13 U8.20 VR1.1 | length 921.8
  Top Layer w0.254: U3.5@66.724,55.753 67.917,55.753 68.201,55.469 C13.2@68.201,55.448 ; U5.13@92.347,53.273 92.602,53.273 92.636,53.238 93.779,53.238 93.844,53.304 93.865,53.304 C12.2@94.007,53.446 ; v1(145.898,55.728) 145.948,55.778 R12.2@147.19,55.778 ; R11.2@150.32,55.778 150.346,55.753 151.181,55.753 v1(151.206,55.728) ; R68.2@159.314,187.578 R68.2@159.314,187.35 159.314,176.83 160.812,175.332 v2(194.492,175.332) ; v1(181.61,69.266) 181.596,69.279 181.596,105.57 184.072,108.046 R44.2@184.072,110.007 184.098,110.033 199.513,110.033 R51.1@199.539,110.059 ; 225.273,44.806 225.273,46.87 U8.20@225.237,46.905 225.237,50.277 225.709,50.749 225.958,50.749 R1.2@226.111,50.902
  Top Layer w0.5: C13.2@68.201,55.448 68.201,51.97 68.25,51.921 ; R2.2@92.354,49.835 93.714,49.835 v1(94.007,50.128) 94.007,53.446 C12.2@94.007,53.467 ; J4.1@101.346,91.338 108.56,91.338 IC!1.60@110.007,92.786 IC!1.30@129.946,92.786 131.293,91.44 138.455,91.44 J3.15@138.506,91.491 ; R8.2@129.769,49.501 129.799,49.531 130.221,49.531 130.573,49.883 131.009,50.319 131.009,50.472 v1(131.03,50.493) C10.2@132.08,50.493 132.11,50.493 132.13,50.513 C10.2@132.13,50.543 ; R6.2@131.928,57.788 133.757,57.788 133.777,57.809 C11.1@133.807,57.809 ; C10.2@132.131,50.544 U2.3@132.131,52.645 ; v1(133.782,59.385) 133.807,59.36 C11.1@133.807,57.809 ; T1.2@136.22,57.531 136.135,57.531 135.878,57.789 133.827,57.789 C11.1@133.807,57.809 ; U1.28@168.06,41.025 169.053,41.025 169.076,41.048 ; 169.178,41.048 C9.2@170.358,41.048 170.378,41.068 C7.1@172.386,41.068 ; R56.2@181.82,51.943 181.82,50.881 181.909,50.792 v1(181.909,50.763) 191.438,50.763 192.264,51.588 ; R57.2@181.854,39.843 181.862,39.835 182.898,39.835 183.765,38.968 191.941,38.968 192.234,39.261 192.234,39.67 R66.2@192.264,39.7 ; R66.2@192.258,39.7 192.258,42.057 v1(192.253,42.062) 192.264,42.073 192.264,51.588 ; R67.2@192.704,52.028 192.704,52.008 192.674,51.978 192.654,51.978 192.264,51.588 ; 216.484,42.033 218.05,42.033 218.415,42.398 C21.1@218.415,42.49 ; C21.1@218.415,42.576 218.415,42.73 218.78,43.095 218.99,43.095 220.296,44.401 220.921,44.401 220.955,44.367 C22.1@221.014,44.367 ; C22.1@221.014,44.401 224.868,44.401 225.273,44.806
  Top Layer w0.508: VR1.1@7.696,92.583 7.925,92.812 15.038,92.812 ; 15.165,92.685 21.031,92.685 J16.3@21.082,92.634 ; 57.785,55.016 R13.2@63.04,55.016 ; IC!1.31@110.007,166.446 110.071,166.51 114.135,166.51 IC!1.61@114.198,166.573 ; v1(154.788,48.87) 154.799,48.859 156.631,48.859 R10.1@156.642,48.847 157.94,48.847 158.852,47.936 158.852,47.17 159.029,46.992 v1(159.029,46.965) ; v1(165.43,38.862) 165.458,38.862 165.724,38.595 167.831,38.595 v1(167.843,38.608) ; v1(204.013,42.012) 205.312,42.012 205.334,42.033 216.484,42.033
  Top Layer w1: J16.3@21.082,92.634 23.589,92.634 23.767,92.812 26.695,92.812 28.575,90.932 ; 38.862,151.027 40.718,152.883 J11.5@43.282,152.883 ; C1.2@195.107,171.204 C1.2@195.125,171.221
  Top Layer w1.524: J18.1@51.816,178.41 41.25,178.41 39.065,176.225 39.065,129.265 43.205,125.125 43.205,105.562 28.575,90.932 U4.2@28.575,63.697 28.575,56.591 30.15,55.016 57.785,55.016 57.785,52.527 59.284,51.029 67.357,51.029 68.25,51.921 72.851,47.32 93.138,47.32 94.031,48.213 94.031,49.759 94.107,49.835
  Bottom Layer w0.254: v1(181.61,69.266) 181.61,51.158 181.909,50.859 v1(181.909,50.763) ; v1(192.253,42.062) v1@192.278,42.037 ; 199.009,175.336 202.057,175.336 *10.TP@205.207,178.486
  Bottom Layer w0.5: v1(133.782,59.385) 133.782,90.17 135.052,91.44 138.455,91.44 J3.15@138.506,91.491 ; v1(172.745,41.121) 172.745,39.906 173.338,39.313 182.391,39.313 v1(182.905,39.827)
  Bottom Layer w0.508: J2.15@101.397,166.421 101.409,166.433 109.995,166.433 IC!1.31@110.007,166.446 ; IC!1.60@110.007,92.786 114.198,96.977 IC!1.61@114.198,166.573 ; v1(159.029,46.965) 165.43,40.564 v1(165.43,38.862) ; v1(167.843,38.608) 169.634,38.608 169.659,38.583 171.422,38.583 172.745,39.906 ; v1(192.253,42.062) 192.28,42.062 192.331,42.012 v1(204.013,42.012)
  Bottom Layer w1.524: J18.1@51.816,178.41 55.093,181.686 183.261,181.686 185.445,183.871 199.462,183.871 200.355,182.978 200.355,176.682 199.009,175.336 198.755,175.082 v2@194.361,175.082 ; v1(94.007,50.128) 94.373,50.493 v1(131.03,50.493) 133.782,53.245 v1(133.782,59.385) 142.24,59.385 v1(145.898,55.728) v1(151.206,55.728) 151.206,50.016 152.099,49.124 154.534,49.124 v1(154.788,48.87)
  other v2: 195.452,174.595 194.487,174.621 196.317,174.676 195.453,175.336 196.265,175.357 195.189,177.749 195.164,178.968 194.752,180.441 195.794,180.441 195.783,181.296 194.742,181.321 195.793,182.265 194.752,182.291
VM: C24.1 J15.2 U8.13 U8.14 U8.24 | length 59.1
  Top Layer w0.254: v1(222.453,48.936) 222.453,48.84 222.637,48.656 U8.24@222.637,46.905
  Top Layer w1.016: C24.1@222.402,57.078 C24.1@222.432,57.078 ; 229.514,46.558 229.514,46.905 229.514,49.657 223.109,56.062 223.109,56.401 C24.1@222.432,57.078 ; J15.2@235.411,63.181 229.309,57.078 C24.1@222.432,57.078
  Bottom Layer w0.5: v1(222.453,48.936) 223.358,48.031 231.71,48.031 233.64,49.961 233.64,54.772 235.569,56.702 236.309,56.702 236.89,57.282 236.89,61.702 J15.2@235.411,63.181
X: J11.4 J12.3 S6.7 | length 179.3
  Top Layer w0.254: J11.4@43.282,150.343 43.307,150.317 53.543,150.317 J12.3@53.569,150.292 55.423,152.146 76.81,152.146 v1(77.597,151.359)
  Bottom Layer w0.254: v1(77.597,151.359) 77.597,168.816 79.266,170.485 150.27,170.485 152.015,168.74 152.015,122.711 153.377,121.35 155.993,121.35 S6.7@156.007,121.336
Y: J11.3 J12.2 S6.8 | length 177.4
  Top Layer w0.254: J11.3@43.282,147.803 43.307,147.777 53.543,147.777 J12.2@53.569,147.752 53.609,147.752 57.266,151.409 76.505,151.409 v1(76.53,151.384)
  Bottom Layer w0.254: v1(76.53,151.384) 76.53,151.389 77.013,151.871 77.013,168.95 79.056,170.993 150.481,170.993 152.523,168.95 152.523,125.471 154.105,123.89 155.993,123.89 S6.8@156.007,123.876
pads on no net: F2.1 F3.1 F4.1 IC!1.29 J3.14 J7. J7.1 J7.8 J11.1 K1.NC K2.NC S1.8 S1.A8 S2.8 S2.A2 S2.A3 S2.A5 S2.A6 S2.A7 S2.A8 S4.A3 S4.A4 S4.A5 S5.A2 S5.A3 S7.1 S7.2 S7.3 S7.4 S7.A1 S7.A2 S7.A3 S7.A4 S8.1 S8.2 S8.3 S8.4 S8.A1 S8.A2 S8.A3 S8.A4 U1.12 U1.15 U1.17 U1.18 U1.20 U1.21 U1.22 U1.23 U2.4 U2.7 U4.S1 U4.S2 U4.S3 U4.S4 U5.2 U5.3 U5.4 U5.5 U5.6 U5.7 U5.14 U5.15 U5.16 U5.17 U5.19 U5.21 U5.22 U7.3 U7.4 U7.5 U7.6 U7.7 U7.10 U7.11 U7.12 U7.13 U7.15 U7.25 U7.26 U7.27 U7.28 U7.29 U7.30 U7.31 U8.7 U8.8 U8.11 U8.12 U8.15 U8.16 U8.17

## Polygon pours and split planes (outlines as drawn)
GND on Top Layer "GND_L01_P027" (solid, pour order 27): 0,3.81 0,201.371 cw(c3.835,201.397) 3.81,205.232 235.915,205.232 cw(c235.941,201.397) 239.776,201.422 239.776,3.835 239.801,3.835 cw(c235.966,3.81) 235.991,-0.025 235.991,0 3.861,0 cw(c3.835,3.835)
NetF1_1 on Top Layer "NETF1_1_L01_P026" (solid, pour order 26): 184.556,189.23 184.569,189.243 184.607,189.205 190.325,189.205 190.348,189.227 190.348,186.69 186.792,186.69 186.792,185.014 184.81,185.014 184.556,185.268
NetCR1_1 on Top Layer "NETCR1_1_L01_P025" (solid, pour order 25): 196.774,189.255 184.582,189.255 184.556,189.23 184.556,185.039 176.149,185.039 175.946,185.242 175.946,196.418 186.36,196.418 196.799,196.418 196.799,195.529 196.774,195.504 196.774,195.58
SHIELD on Top Layer "SHIELD_L01_P000" (hatched 45Degree grid 1.143 track 0.178, pour order 0): 215.62,79.604 215.594,79.629 215.594,97.612 235.076,97.612 235.457,97.231 235.457,79.705 215.721,79.705
+5 on Top Layer "NONET_L-01_P-001" (solid, pour order 20): 188.341,186.665 190.576,186.665 190.576,189.128 194.132,189.128 194.132,176.86 188.392,176.86 188.341,176.911
VCC on Top Layer "NONET_L-01_P-001" (solid, pour order 21): 194.335,182.855 196.164,182.855 196.164,176.886 196.863,176.873 196.863,169.545 193.599,169.545 193.599,176.911 193.65,176.962 193.65,179.4 194.335,179.4 194.361,179.426 194.335,179.451
GND on Bottom Layer "GND_L02_P024" (solid, pour order 24): 0.015,3.835 0.015,201.397 cw(c3.851,201.422) 3.825,205.257 235.931,205.257 cw(c235.956,201.422) 239.791,201.447 239.791,3.861 239.817,3.861 cw(c235.981,3.835) 236.007,0 236.007,0.025 3.876,0.025 cw(c3.851,3.861)

## Other copper
Top Layer:
  pour cut-out: 64.389,57.023 67.64,57.023 67.64,54.559 64.389,54.559 64.389,56.921
  pour cut-out: 194.717,36.881 197.383,36.881 197.383,28.856 194.818,28.856 194.818,36.78
Bottom Layer:
  pour cut-out: 215.265,97.968 235.991,97.968 235.991,79.299 215.265,79.299
  pour cut-out: 64.211,57.023 67.775,57.023 67.789,54.102 64.211,54.102

## Silkscreen, mask and mechanical layers (free items; w line width, h text height)
Top Overlay:
  drawing of 1563 lines, arcs and shapes, not listed
  text "DON'T" at 200.838,199.593 h1.02
  text "EXCEED" at 200.355,198.12 h1.02
  text "UART" at 216.192,197.807 h2.5
  text "PSOC 4100S PLUS TRAINER KIT" at 33.361,197.51 h4.32
  text "5V" at 202.082,196.647 h1.02
  text "5V" at 169.244,192.018 h2.3
  text "TX" at 217.551,191.796 h1
  text "RX" at 220.421,191.796 h1
  text "3V3" at 152.514,191.764 h2.3
  text "IR SENSOR" at 3.094,190.287 h2.5
  text "GND" at 54.188,182.792 h1.52
  text "RELAY CIRCUIT" at 212.848,180.889 h2.5
  text "IR" at 54.086,180.228 h1.52
  text "VCC" at 54.188,177.841 h1.52
  text "PERIPHERAL" at 157.264,169.774 h2.3
  text "PERIPHERAL" at 64.572,169.678 h2.3
  text "NC" at 170.115,167.561 h2.03
  text "NC" at 65.017,167.332 h2.03
  text "JOYSTICK" at 2.988,166.996 h2.5
  text "+3V3" at 92.794,165.522 h2.03
  text "GND" at 141.028,165.072 h2.03
  text "POWER SUPPLY" at 178.791,164.97 h2.5
  text "LED 1" at 167.796,164.922 h2.03
  text "NC" at 65.017,164.767 h2.03
  text "P3_6" at 92.827,162.982 h2.03
  text "P3_5" at 141.062,162.532 h2.03
  text "PIR" at 169.625,162.204 h2.03
  text "NC" at 65.017,162.049 h2.03
  text "P3_7" at 92.827,160.442 h2.03
  text "P3_4" at 141.062,159.992 h2.03
  text "LED 2" at 167.591,159.715 h2.03
  text "COM" at 226.947,159.701 h1.52
  text "NC" at 65.017,159.306 h2.03
  text "P4_0" at 92.827,157.902 h2.03
  text "P3_3" at 141.062,157.452 h2.03
  text "SHIELD" at 64.939,156.971 h2.03
  text "BT 2" at 168.798,156.947 h2.03
  text "P4_1" at 92.827,155.362 h2.03
  text "NO" at 226.845,155.027 h1.52
  text "P3_2" at 141.062,154.912 h2.03
  text "LEDS" at 180.416,154.796 h2.5
  text "NC" at 65.017,154.429 h2.03
  text "SDA" at 168.747,154.329 h2.03
  text "P4_2" at 92.827,152.822 h2.03
  text "P3_1" at 141.062,152.372 h2.03
  text "SCL" at 168.995,151.993 h2.03
  text "NC" at 65.017,151.867 h2.03
  text "P4_3" at 92.827,150.282 h2.03
  text "P3_0" at 141.062,149.832 h2.03
  text "X" at 47.823,149.671 h1.52
  text "TOUCH 1" at 164.873,148.792 h2.03
  text "UART TX" at 65.024,148.638 h2.03
  text "P4_4" at 92.827,147.742 h2.03
  text "P6_5" at 141.087,147.361 h2.03
  text "Y" at 47.8,147.253 h1.52
  text "SERVO SIG" at 162.687,145.517 h2.03
  text "P4_5" at 92.827,145.202 h2.03
  text "UART TX" at 65.151,145.056 h2.03
  text "P6_4" at 141.062,144.752 h2.03
  text "SW" at 47.8,144.61 h1.52
  text "AIN 2" at 167.957,142.697 h2.03
  text "P4_6" at 92.827,142.662 h2.03
  text "DP" at 65.017,142.367 h2.03
  text "P6_2" at 141.062,142.212 h2.03
  text "P4_7" at 92.827,140.122 h2.03
  text "AIN 1" at 168.162,140.056 h2.03
  text "NO" at 227.023,140.041 h1.52
  text "G" at 65.017,139.953 h2.03
  text "P6_1" at 141.062,139.672 h2.03
  text "PWMA" at 166.897,137.617 h2.03
  text "P5_6" at 92.827,137.582 h2.03
  text "NC" at 65.017,137.284 h2.03
  text "P6_0" at 140.882,137.132 h2.03
  text "LED2" at 191.605,135.56 h1.52 r90
  text "LED1" at 194.204,135.55 h1.52 r90
  text "LED3" at 189.078,135.512 h1.52 r90
  text "LED 3" at 167.578,135.23 h2.03
  text "P5_7" at 92.827,135.042 h2.03
  text "COM" at 227.023,135.063 h1.52
  text "NC" at 65.017,134.795 h2.03
  text "P2_7" at 141.062,134.592 h2.03
  text "IO RST" at 166.613,132.842 h2.03
  text "P7_0" at 92.827,132.502 h2.03
  text "NC" at 65.017,132.433 h2.03
  text "P2_6" at 141.062,132.052 h2.03
  text "RELAY 1" at 165.266,130.124 h2.03
  text "P7_1" at 92.827,129.962 h2.03
  text "SWITCHES" at 177.749,129.886 h2.5
  text "NC" at 65.017,129.74 h2.03
  text "P2_5" at 141.062,129.512 h2.03
  text "BUTTON 2" at 198.788,128.77 h1.52 r270
  text "BUTTON 1" at 182.359,128.593 h1.52 r270
  text "SW joy" at 166.544,127.406 h2.03
  text "F" at 65.017,126.695 h2.03
  text "P0_0" at 92.751,126.304 h2.03
  text "P2_4" at 141.028,126.058 h2.03
  text "P0_1" at 92.751,123.764 h2.03
  text "Y" at 171.296,123.571 h2.03
  text "P2_3" at 141.062,123.518 h2.03
  text "E" at 65.017,123.038 h2.03
  text "SERVO MOTOR" at 0,121.453 h2.5
  text "P0_2" at 92.751,121.224 h2.03
  text "P2_2" at 141.062,120.978 h2.03
  text "X" at 171.303,120.665 h2.03
  text "D" at 65.017,120.066 h2.03
  text "P0_3" at 92.751,118.684 h2.03
  text "POT" at 168.946,118.542 h2.03
  text "P2_1" at 141.062,118.438 h2.03
  text "C" at 65.017,117.678 h2.03
  text "VCC" at 37.035,117.604 h1.52 r90
  text "P0_4" at 92.751,116.144 h2.03
  text "P2_0" at 141.062,115.898 h2.03
  text "IR" at 170.828,115.849 h2.03
  text "B" at 65.017,115.062 h2.03
  text "P0_5" at 92.751,113.604 h2.03
  text "P1_7" at 141.062,113.358 h2.03
  text "RELAY 2" at 165.061,113.233 h2.03
  text "A" at 65.017,112.395 h2.03
  text "SIG" at 38.483,111.655 h1.52
  text "P0_6" at 92.751,111.064 h2.03
  text "P1_6" at 141.062,110.818 h2.03
  text "BT 1" at 169.002,110.769 h2.03
  text "NC" at 65.017,110.211 h2.03
  text "P0_7" at 92.751,108.524 h2.03
  text "P1_5" at 141.062,108.278 h2.03
  text "SECURE CS" at 162.063,107.823 h2.03
  text "NC" at 65.017,107.518 h2.03
  text "P5_0" at 92.751,105.984 h2.03
  text "P1_4" at 141.062,105.738 h2.03
  text "SD CARD" at 164.388,104.978 h2.03
  text "SD_CARD" at 64.999,104.724 h2.03
  text "GND" at 37.022,104.265 h1.52 r90
  text "P5_1" at 92.751,103.444 h2.03
  text "TOUCH" at 208.677,103.394 h2.5
  text "P1_3" at 141.062,103.198 h2.03
  text "EE PROM" at 164.396,102.057 h2.03
  text "P5_2" at 92.751,100.904 h2.03
  text "P1_2" at 141.062,100.658 h2.03
  text "TEMP ALERT" at 64.922,100.279 h2.03
  text "SCK" at 168.743,99.238 h2.03
  text "P5_3" at 92.751,98.364 h2.03
  text "P1_1" at 141.062,98.118 h2.03
  text "GYRO" at 64.948,97.663 h2.03
  text "POT" at 23.13,96.545 h2.5 r270
  text "MISO" at 168.068,96.545 h2.03
  text "P5_5" at 92.751,95.824 h2.03
  text "P1_0" at 141.062,95.578 h2.03
  text "NC" at 65.017,95.479 h2.03
  text "MOSI" at 168.113,93.447 h2.03
  text "GND" at 92.751,93.284 h2.03
  text "NC" at 141.062,93.038 h2.03
  text "IO" at 65.017,92.634 h2.03
  text "VCC" at 14.859,92.131 h1.52
  text "NC" at 170.115,91.161 h2.03
  text "+3V3" at 141.062,90.498 h2.03
  text "NC" at 65.017,90.211 h2.03
  text "OUT" at 14.961,89.361 h1.52
  text "NC" at 170.115,88.646 h2.03
  text "NC" at 65.017,87.528 h2.03
  text "GND" at 15.011,86.872 h1.52
  text "NC" at 170.115,85.928 h2.03
  text "NC" at 65.017,85.217 h2.03
  text "NC" at 170.115,83.287 h2.03
  text "NC" at 65.017,82.347 h2.03
  text "SCL" at 176.378,73.254 h2.03
  text "I2C BUS" at 101.536,70.885 h2.5
  text "SDA" at 176.301,70.736 h2.03
  text "I2C" at 174.028,68.986 h1.78
  text "N20 MOTOR" at 208.677,67.605 h2.5
  text "0X3C" at 17.043,66.103 h2.5
  text "EX-SWITCH" at 180.017,63.736 h2.5
  text "LED ROW" at 143.734,62.975 h1
  text "GND" at 227.068,62.708 h1.52
  text "0x20" at 155.3,61.402 h2.5
  text "0X48" at 60.432,61.337 h2.5
  text "0X68" at 84.135,61.108 h2.5
  text "0X51" at 124.485,60.905 h2.5
  text "VM" at 227.15,57.391 h1.52
  text "AO2" at 237.442,42.674 h1.52 r90
  text "SPI BUS" at 131.318,39.461 h2.5
  text "MOSI" at 139.752,36.973 h1
  text "CMD" at 129.934,36.933 h1
  text "MISO" at 198.261,34.642 h1.52
  text "CLK" at 129.866,34.433 h1
  text "SCK" at 139.752,34.433 h1
  text "7-SEGMENT DISPLAY" at 60.113,32.501 h2.5
  text "ESP-01" at 16.572,32.223 h2.5
  text "MOSI" at 198.197,32.144 h1.52
  text "MISO" at 139.752,31.893 h1
  text "D0" at 130.384,31.883 h1
  text "AO1" at 237.454,31.011 h1.52 r90
  text "SCK" at 198.165,29.645 h1.52
  text "SD CARD" at 106.239,26.888 h2.5
  text "SECURE" at 179.849,24.07 h2.5
  text "DP" at 69.134,23.19 h1.52 r90
  text "G" at 71.675,23.19 h1.52 r90
  text "A" at 86.914,23.165 h1.52 r90
  text "D" at 79.294,23.139 h1.52 r90
  text "B" at 84.247,23.139 h1.52 r90
  text "E" at 76.754,23.114 h1.52 r90
  text "F" at 74.214,23.089 h1.52 r90
  text "C" at 81.656,23.089 h1.52 r90
  text "EEPEOM" at 142.418,19.544 h2.5
Mechanical 13:
  lines w0.254: 3.819,0 235.95,0 ; 3.861,0 cw(c3.835,3.835) 0,3.81 0,201.371 cw(c3.835,201.397) 3.81,205.232 235.941,205.232 ; 235.915,205.232 cw(c235.941,201.397) 239.776,201.422 239.776,3.835 ; 235.991,-0.025 ccw(c235.966,3.81) 239.801,3.835